# Altium PCB CANable-250818.PcbDoc
Units mm, origin at the board's own origin, x right, y up, seen from the top; angles counter-clockwise.
Board outline 50 x 33.5 mm, 2 copper layers (Top Layer, Bottom Layer); 38 components, 24 nets, 154 pads, 192 vias.
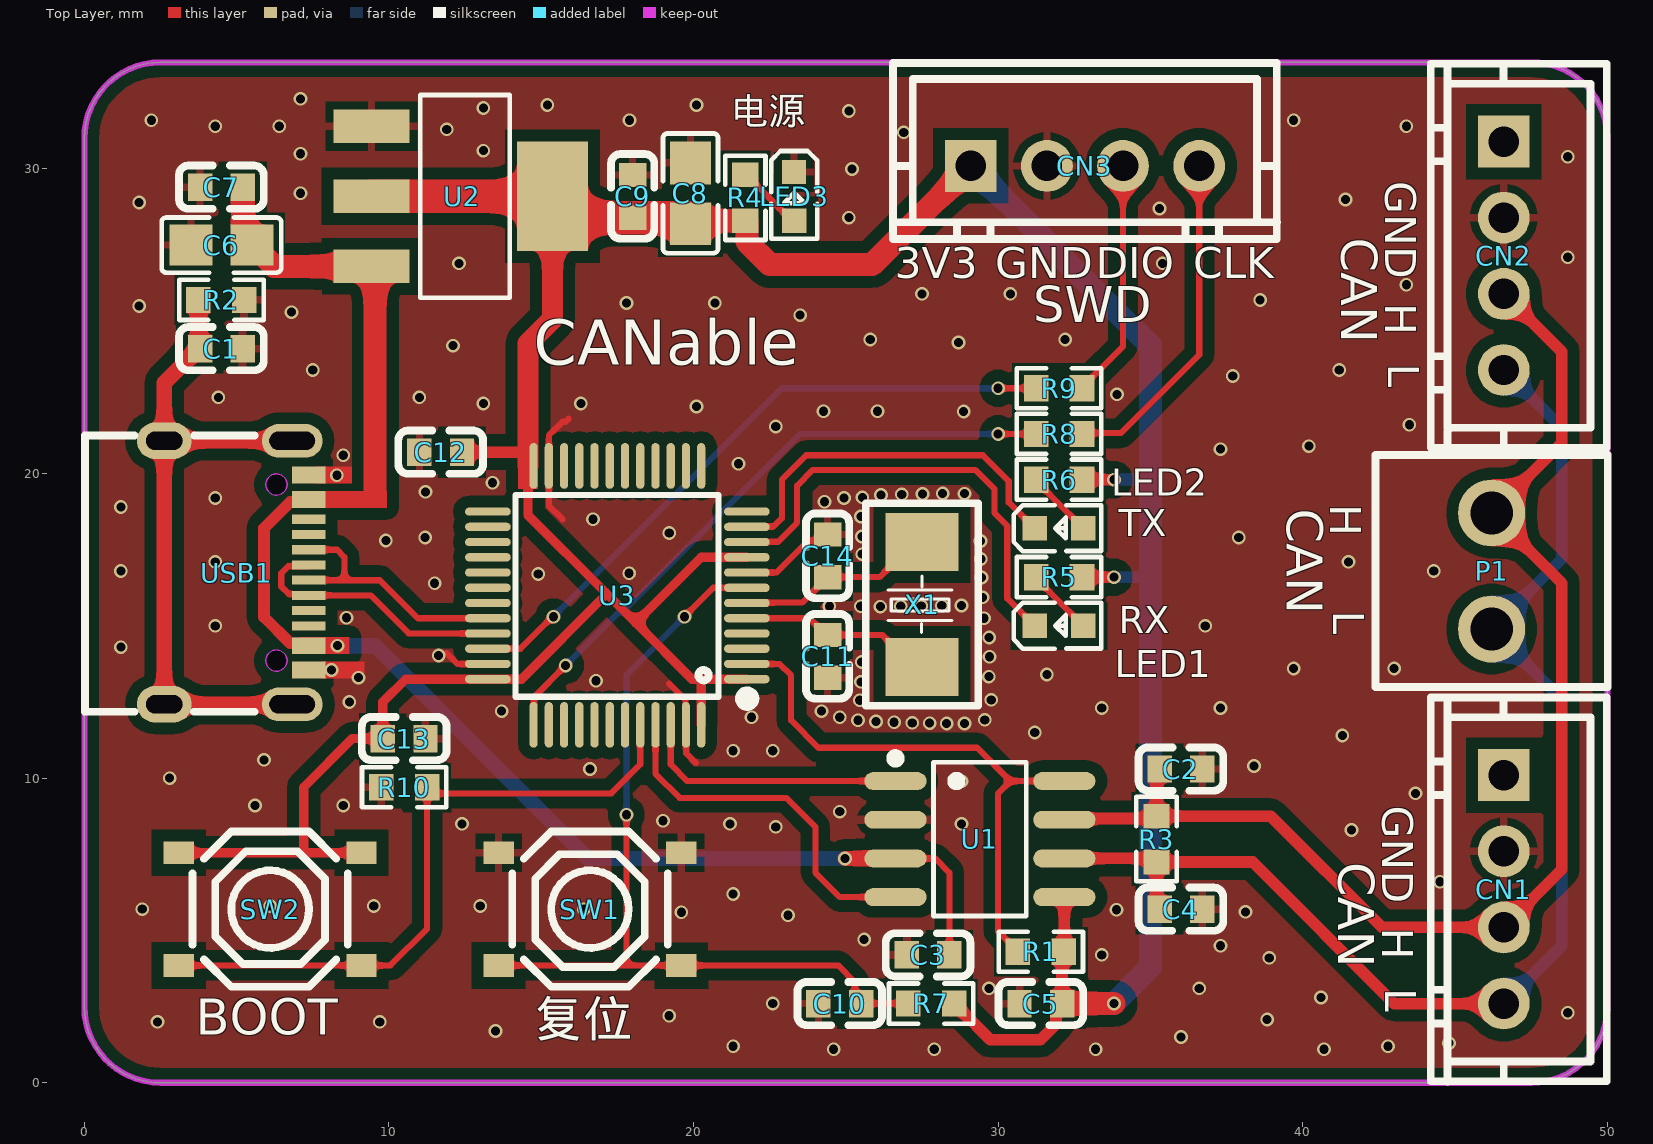
[diagram p0: Top Layer view]
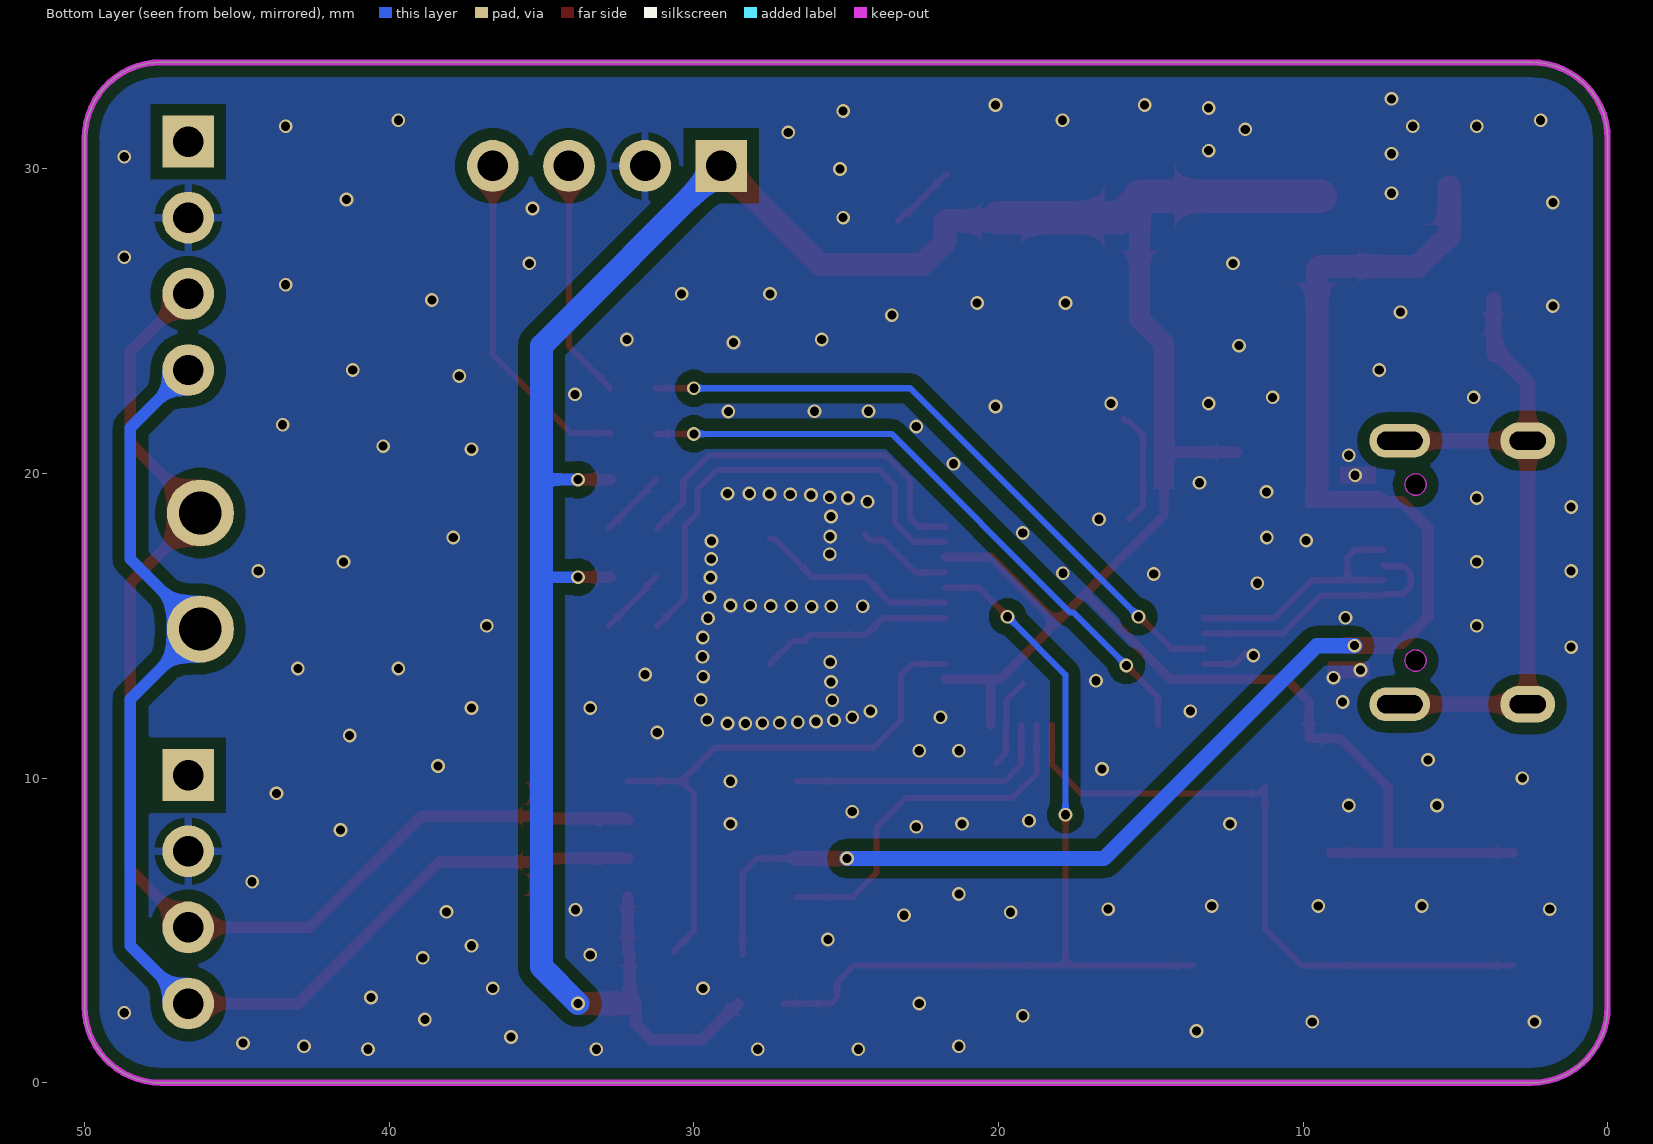
[diagram p1: Bottom Layer view, seen from below]

## Layer stack, top to bottom
Top Solder: solder mask 0.0102, Solder Resist, Dk 3.5
Top Layer: signal copper 0.0356
Dielectric 1: dielectric 0.32, FR-4, Dk 4.8
Bottom Layer: signal copper 0.0356
Bottom Solder: solder mask 0.0102, Solder Resist, Dk 3.5

## Board outline
0,2.5 0,31 cw(c2.5,31) 2.5,33.5 47.5,33.5 cw(c47.5,31) 50,31 50,2.5 cw(c47.5,2.5) 47.5,0 2.5,0 cw(c2.5,2.5)

## Design rules (kind name [scope] priority, off if disabled: settings)
Clearance Clearance_1 [InPolygon] p1: gap=0.381 ignorepadtopadclearanceinfootprint=FALSE
Clearance [All] p2: gap=0.152 ignorepadtopadclearanceinfootprint=FALSE
ComponentClearance [All] p1 off: gap=0.254 collisioncheckmode=3 verticalgap=0.254 showdistances=FALSE
HoleToHoleClearance [All] p1 off: gap=0.254 allowstackedmicrovias=TRUE
MinimumSolderMaskSliver [All] p1 off: minsoldermaskwidth=0.254
PolygonConnect PolygonConnect_1 [IsVia] p1: connectstyle=Direct reliefconductorwidth=0.254 reliefentries=4 polygonreliefangle="90 Angle" airgapwidth=0.254
PolygonConnect [All] p2: connectstyle=Relief reliefconductorwidth=0.254 reliefentries=4 polygonreliefangle="90 Angle" airgapwidth=0.254
RoutingVias [All] p1: holewidth=0.3 width=0.45 viastyle="Through Hole" minholewidth=0.3 minwidth=0.4 maxholewidth=5 maxwidth=5
SilkToSilkClearance [All] p1 off: silktosilkclearance=0.254
SilkToSolderMaskClearance [IsPad] p1 off: minsilkscreentomaskgap=0.254 clearancetoexposedcopper=TRUE
SolderMaskExpansion [All] p1: expansion=0.102 istentingtop=FALSE
Width [All] p1: maxlimit=2.54 minlimit=0.152 preferedwidth=0.203
25 further rules are at their usual default settings.

## Components (designator, comment, footprint, x,y, rotation, side; value= is the part's Value field where it differs from the comment)
C1 "100nF" C0603 4.5,24.1 r0 top
C2 "20pF" C0603 36,10.3 r0 top
C3 "100nF" C0603 27.7,4.2 r0 top
C4 "20pF" C0603 36,5.7 r180 top
C5 "100nF" C0603 31.4,2.6 r180 top
C6 "10uF" C0805 4.5,27.5 r180 top
C7 "100nF" C0603 4.5,29.4 r180 top
C8 "10uF" C0805 19.9,29.2 r90 top
C9 "100nF" C0603 18,29.1 r90 top
C10 "100nF" C0603 24.8,2.6 r180 top
C11 "20pF" C0603 24.4,14 r90 top locked
C12 "100nF" C0603 11.7,20.7 r180 top
C13 "100nF" C0603 10.5,11.3 r0 top
C14 "20pF" C0603 24.4,17.3 r270 top locked
CN1 "XH-4A" CONN-TH_4P-P2.50_XH-4A 46.6,6.35 r270 top locked
CN2 "XH-4A" CONN-TH_4P-P2.50_XH-4A 46.6,27.15 r270 top locked
CN3 "XH-4A" CONN-TH_4P-P2.50_XH-4A 32.85,30.1 r0 top locked
LED1 "KT-0603R" LED0603-RD 32,15 r0 top
LED2 "KT-0603R" LED0603-RD 32,18.2 r0 top
LED3 "KT-0603R" LED0603-RD 23.3,29.1 r270 top
P1 "WJ124-3.81-2P" CONN-TH_2P-P3.81_KF124-3.81-2P 46.2,16.8 r90 top locked
R1 "10kΩ" R0603 31.4,4.3 r0 top
R2 "1MΩ" R0603 4.5,25.7 r0 top
R3 "120Ω" R0603 35.2,8 r270 top
R4 "1kΩ" R0603 21.7,29.053 r90 top
R5 "1kΩ" R0603 32,16.6 r180 top
R6 "1kΩ" R0603 32,19.8 r180 top
R7 "10kΩ" R0603 27.8,2.6 r180 top
R8 "100Ω" R0603 32,21.3 r0 top
R9 "100Ω" R0603 32,22.8 r0 top
R10 "10kΩ" R0603 10.5,9.7 r180 top
SW1 "TS-1187A-B-A-B" SW-SMD_4P-L5.1-W5.1-P3.70-LS6.5-TL_H1.5 16.6,5.7 r0 top
SW2 "TS-1187A-B-A-B" SW-SMD_4P-L5.1-W5.1-P3.70-LS6.5-TL_H1.5 6.1,5.7 r180 top
U1 "TJA1051T/3/1J" SOIC-8_L4.9-W3.9-P1.27-LS6.0-BL 29.4,8 r270 top
U2 "AMS1117-3.3" SOT-223-3_L6.5-W3.4-P2.30-LS7.0-BR 12.4,29.1 r180 top
U3 "STM32F072CBT6" LQFP-48_L7.0-W7.0-P0.50-LS9.0-BL 17.5,16 r90 top locked
USB1 "TYPE-C 16PIN 2MD(073)" USB-C-SMD_TYPE-C-6PIN-2MD-073 5,16.75 r270 top locked
X1 "8MHz" CRYSTAL-SMD_L5.0-W3.2 27.5,15.7 r270 top locked

## Footprints (in the part's own frame and the unit in brackets; to place one, negate y for a bottom-side part, rotate by r counter-clockwise, add the part's x,y. Pads: shape width x height; smd on the part's side, far side on the other; paste and mask are expansions set on the pad)
C0603 [mm]
  rect 0.8x0.9 smd: 1(-0.7,0) 2(0.7,0)
  silkscreen extent -1.39,-0.71 1.39,0.71
C0805 [mm]
  rect 1.41x1.35 smd paste-100 mask+0.051: 1(-1,0) 2(1,0)
  silkscreen extent -1.96,-0.9 1.96,0.9
CONN-TH_2P-P3.81_KF124-3.81-2P [mm]
  round 2.2 hole 1.4: 1(-1.905,0) 2(1.905,0)
  silkscreen extent -3.81,-3.81 3.81,3.81
CONN-TH_4P-P2.50_XH-4A [mm]
  rect 1.7x1.7 hole 1: 1(-3.75,0)
  round 1.7 hole 1: 2(-1.25,0) 3(1.25,0) 4(3.75,0)
  silkscreen extent -6.3,-2.4 6.31,3.38
CRYSTAL-SMD_L5.0-W3.2 [mm]
  rect 1.9x2.4 smd: 1(-2.05,0) 2(2.05,0)
  silkscreen extent -3.32,-1.85 3.33,1.85
LED0603-RD [mm]
  rect 0.8x0.8 smd: 1(-0.799,0) 2(0.799,0)
  silkscreen extent -1.49,-0.75 1.39,0.76
LQFP-48_L7.0-W7.0-P0.50-LS9.0-BL [mm]
  oval 0.27x1.5 smd paste+0 mask+0.05: 1(-2.75,-4.25) 2(-2.25,-4.25) 3(-1.75,-4.25) 4(-1.25,-4.25) 5(-0.75,-4.25) 6(-0.25,-4.25) 7(0.25,-4.25) 8(0.75,-4.25) 9(1.25,-4.25) 10(1.75,-4.25) 11(2.25,-4.25) 12(2.75,-4.25) 25(2.75,4.25) 26(2.25,4.25) 27(1.75,4.25) 28(1.25,4.25) 29(0.75,4.25) 30(0.25,4.25) 31(-0.25,4.25) 32(-0.75,4.25) 33(-1.25,4.25) 34(-1.75,4.25) 35(-2.25,4.25) 36(-2.75,4.25)
  oval 1.5x0.27 smd paste+0 mask+0.05: 13(4.25,-2.75) 14(4.25,-2.25) 15(4.25,-1.75) 16(4.25,-1.25) 17(4.25,-0.75) 18(4.25,-0.25) 19(4.25,0.25) 20(4.25,0.75) 21(4.25,1.25) 22(4.25,1.75) 23(4.25,2.25) 24(4.25,2.75) 37(-4.25,2.75) 38(-4.25,2.25) 39(-4.25,1.75) 40(-4.25,1.25) 41(-4.25,0.75) 42(-4.25,0.25) 43(-4.25,-0.25) 44(-4.25,-0.75) 45(-4.25,-1.25) 46(-4.25,-1.75) 47(-4.25,-2.25) 48(-4.25,-2.75)
  silkscreen extent -3.59,-4.46 3.3,3.34
R0603 [mm]
  rect 0.806x0.864 smd paste-100 mask+0.051: 1(-0.753,0) 2(0.753,0)
  silkscreen extent -1.39,-0.66 1.39,0.66
SOIC-8_L4.9-W3.9-P1.27-LS6.0-BL [mm]
  oval 0.588x2.045 smd: 1(-1.905,-2.772) 2(-0.635,-2.772) 3(0.635,-2.772) 4(1.905,-2.772) 5(1.905,2.772) 6(0.635,2.772) 7(-0.635,2.772) 8(-1.905,2.772)
  silkscreen extent -2.8,-2.92 2.53,1.52
SOT-223-3_L6.5-W3.4-P2.30-LS7.0-BR [mm]
  rect 2.5x1.1 smd: 1(2.97,-2.3) 2(2.97,0) 3(2.97,2.3)
  rect 2.34x3.6 smd: 4(-2.97,0)
  silkscreen extent -1.57,-3.33 1.37,3.33
SW-SMD_4P-L5.1-W5.1-P3.70-LS6.5-TL_H1.5 [mm]
  rect 1x0.75 smd: 1(-3,1.85) 2(3,1.85) 3(-3,-1.85) 4(3,-1.85)
  silkscreen extent -2.55,-2.55 2.55,2.55
USB-C-SMD_TYPE-C-6PIN-2MD-073 [mm]
  rect 0.55x1.1 smd paste-100 mask+0.05: 1(-3.2,2.375) 2(-2.4,2.375) 11(2.4,2.375) 12(3.2,2.375)
  rect 0.3x1.1 smd paste-100 mask+0.05: 3(-1.75,2.375) 4(-1.25,2.375) 5(-0.75,2.375) 6(-0.25,2.375) 7(0.25,2.375) 8(0.75,2.375) 9(1.25,2.375) 10(1.75,2.375)
  oval 1.2x1.8 hole 0.6 slot 1.2 at 90 deg paste+0 mask+0.05: 13(-4.325,-2.375) 14(4.325,-2.375)
  oval 1.1x2 hole 0.6 slot 1.5 at 90 deg paste+0 mask+0.05: 13(-4.325,1.825) 14(4.325,1.825)
  Keep-Out Layer board cut-out: 3.24,1.305 3.205,1.153 3.108,1.031 2.968,0.964 2.812,0.964 2.672,1.031 2.575,1.153 2.54,1.305 2.54,1.305 2.575,1.457 2.672,1.579 2.812,1.646 2.968,1.646 3.108,1.579 3.205,1.457 3.24,1.305
  Keep-Out Layer board cut-out: -2.54,1.305 -2.575,1.153 -2.672,1.031 -2.812,0.964 -2.968,0.964 -3.108,1.031 -3.205,1.153 -3.24,1.305 -3.24,1.305 -3.205,1.457 -3.108,1.579 -2.968,1.646 -2.812,1.646 -2.672,1.579 -2.575,1.457 -2.54,1.305
  Keep-Out Layer circle w0.025: c2.89,1.305 r0.35
  Keep-Out Layer circle w0.025: c-2.89,1.305 r0.35
  Keep-Out Layer region: 3.24,1.305 3.205,1.153 3.108,1.031 2.968,0.964 2.812,0.964 2.672,1.031 2.575,1.153 2.54,1.305 2.54,1.305 2.575,1.457 2.672,1.579 2.812,1.646 2.968,1.646 3.108,1.579 3.205,1.457 3.24,1.305
  Keep-Out Layer region: -2.54,1.305 -2.575,1.153 -2.672,1.031 -2.812,0.964 -2.968,0.964 -3.108,1.031 -3.205,1.153 -3.24,1.305 -3.24,1.305 -3.205,1.457 -3.108,1.579 -2.968,1.646 -2.812,1.646 -2.672,1.579 -2.575,1.457 -2.54,1.305
  silkscreen extent -4.5,-4.97 4.57,0.6

## Part data
C1 C3 C5 C7 C9 C10 C12 C13: library part CC0603KRX7R9BB104, JLCPCB Part Class="Basic Part", LCSC Part Name="100nF ±10% 50V", Manufacturer=YAGEO(国巨), Temperature Coefficient=X7R, Tolerance=±10%, Voltage Rating=50V, Add into BOM=yes, Convert to PCB=yes, Datasheet=https://atta.szlcsc.com/upload/public/pdf/source/20250214/096C4C206003071F5D32E5F0D8E7F8DF.pdf, Device=CC0603KRX7R9BB104, Manufacturer Part=CC0603KRX7R9BB104, Supplier=LCSC, Supplier Footprint=0603, Supplier Part=C14663, Symbol=CC0603KRX7R9BB104
C2 C4 C11 C14: library part CL10C200JB8NNNC, JLCPCB Part Class="Basic Part", LCSC Part Name="20pF ±5% 50V", Manufacturer=SAMSUNG(三星), Temperature Coefficient=C0G, Tolerance=±5%, Voltage Rating=50V, Add into BOM=yes, Convert to PCB=yes, Datasheet=https://item.szlcsc.com/datasheet/CL10C200JB8NNNC/2000.html, Device=CL10C200JB8NNNC, Manufacturer Part=CL10C200JB8NNNC, Supplier=LCSC, Supplier Footprint=0603, Supplier Part=C1648, Symbol=CL10C200JB8NNNC
C6 C8: library part CL21A106KAYNNNE_C15850, JLCPCB Part Class="Basic Part", LCSC Part Name="10uF ±10% 25V", Manufacturer=SAMSUNG(三星), Manufacturer Part=CL21A106KAYNNNE, Temperature Coefficient=X5R, Tolerance=±10%, Voltage Rated=25V, Add into BOM=yes, Convert to PCB=yes, Datasheet=https://atta.szlcsc.com/upload/public/pdf/source/20160218/1457707763339.pdf, Device=CL21A106KAYNNNE_C15850, Supplier=LCSC, Supplier Footprint=0805, Supplier Part=C15850, Symbol=CL21A106KAYNNNE
CN1 CN2 CN3: library part XH-4A_C37815, Color=-, JLCPCB Part Class="Extended Part", LCSC Part Name="1x4P 间距:2.5mm 直插 系列:XH", Manufacturer=BOOMELE(博穆精密), Add into BOM=yes, Contact Material=-, Contact Plating=-, Convert to PCB=yes, Current Rating=-, Datasheet=https://atta.szlcsc.com/upload/public/pdf/source/20181205/C146112_2CB31444E6250AC61E2A41A9A8391D5F.pdf, Device=XH-4A_C37815, Flame Retardant Rating=-, Manufacturer Part=XH-4A, Mounting Type=直插, Number of Pins=4P, Number of PINs Per Row=4, Number of Rows=1, Operating Temperature=-, Pins Structure=1x4P, Pitch=2.5mm, Plastic Material=-, Reference Series=XH, Row Spacing=-, Supplementary Features=-, Supplier=LCSC, Supplier Footprint=插件,P=2.5mm, Supplier Part=C37815, Symbol=XH-4A, Voltage Rating=-, X-Length of Bottom Edge on Board (Spacing Line)=-, Y-Width of Bottom Edge on Board=-, Z-Height of the Board=-
LED1 LED2 LED3: Color Temperature=-, Emitted Color=红色, JLCPCB Part Class="Basic Part", LCSC Part Name="0603 红灯 高亮", Manufacturer=KENTO, Operating Temperature=-40℃~+85℃, Add into BOM=yes, Convert to PCB=yes, Datasheet=https://atta.szlcsc.com/upload/public/pdf/source/20160616/1466072038404.pdf, Device=KT-0603R, Diode Configuration=-, Dominant Wavelength=-, Forward Current=-, Lens Color=-, Manufacturer Part=KT-0603R, Mounting Sytle=-, Peak Wavelength=-, Power Dissipation=-, Supplier=LCSC, Supplier Footprint=0603, Supplier Part=C2286, Symbol=KT-0603R, Viewing Angle=-
P1: Color=绿色, Current Rating (Max)=15A, JLCPCB Part Class="Extended Part", LCSC Part Name="3.81mm 1x2P 排数:1 每排P数:2 直插", Manufacturer=KANGNEX(康奈克斯电气), Operating Temperature Range=-40℃~+105℃, Voltage Rating (Max)=300V, Add into BOM=yes, Convert to PCB=yes, Datasheet=https://atta.szlcsc.com/upload/public/pdf/source/20191225/C69811_9330EF2523583BB8A7E3F75AE744BFE0.pdf, Device=WJ124-3.81-2P, Manufacturer Part=WJ124-3.81-2P, Mounting Style=直插, Number of Pins=2P, Number of PINs Per Row=2, Number of Rows=1, Pitch=3.81mm, Structure=1x2P, Supplier=LCSC, Supplier Footprint=插件,P=3.81mm, Supplier Part=C69811, Symbol=WJ124-3.81-2P, Wire Gauge - AWG=14~30, Wire Gauge - mm2=1.5
R1 R7 R10: library part 0603WAF1002T5E, JLCPCB Part Class="Basic Part", LCSC Part Name="厚膜电阻 10kΩ ±1% 100mW", Manufacturer=UNI-ROYAL(厚声), Operating Temperature=-55℃~+155℃, Power(Watts)=100mW, Temperature Coefficient=±100ppm/℃, Tolerance=±1%, Voltage-Supply(Max)=75V, Add into BOM=yes, Convert to PCB=yes, Datasheet=https://atta.szlcsc.com/upload/public/pdf/source/20200306/C422600_1E6D84923E4A46A82E41ADD87F860B5C.pdf, Device=0603WAF1002T5E, Manufacturer Part=0603WAF1002T5E, Supplier=LCSC, Supplier Footprint=0603, Supplier Part=C25804, Symbol=0603WAF1002T5E, Type=厚膜电阻
R2: library part 0603WAF1004T5E, JLCPCB Part Class="Basic Part", LCSC Part Name="1MΩ ±1% 100mW 厚膜电阻", Manufacturer=UNI-ROYAL(厚声), Operating Temperature Range=-55℃~+155℃, Overload Voltage (Max)=75V, Power(Watts)=100mW, Temperature Coefficient=±100ppm/℃, Tolerance=±1%, Add into BOM=yes, Convert to PCB=yes, Datasheet=https://atta.szlcsc.com/upload/public/pdf/source/20200306/C422600_1E6D84923E4A46A82E41ADD87F860B5C.pdf, Device=0603WAF1004T5E, Manufacturer Part=0603WAF1004T5E, Supplier=LCSC, Supplier Footprint=0603, Supplier Part=C22935, Symbol=0603WAF1004T5E, Type=厚膜电阻
R3: library part 0603WAF1200T5E, JLCPCB Part Class="Basic Part", LCSC Part Name="120Ω ±1% 100mW 厚膜电阻", Manufacturer=UNI-ROYAL(厚声), Operating Temperature Range=-55℃~+155℃, Overload Voltage (Max)=75V, Power(Watts)=100mW, Temperature Coefficient=±100ppm/℃, Tolerance=±1%, Add into BOM=yes, Convert to PCB=yes, Datasheet=https://atta.szlcsc.com/upload/public/pdf/source/20200306/C422600_1E6D84923E4A46A82E41ADD87F860B5C.pdf, Device=0603WAF1200T5E, Manufacturer Part=0603WAF1200T5E, Supplier=LCSC, Supplier Footprint=0603, Supplier Part=C22787, Symbol=0603WAF1200T5E, Type=厚膜电阻
R4 R5 R6: library part 0603WAF1001T5E, JLCPCB Part Class="Basic Part", LCSC Part Name="1kΩ ±1% 100mW 厚膜电阻", Manufacturer=UNI-ROYAL(厚声), Operating Temperature Range=-55℃~+155℃, Overload Voltage (Max)=75V, Power(Watts)=100mW, Temperature Coefficient=±100ppm/℃, Tolerance=±1%, Add into BOM=yes, Convert to PCB=yes, Datasheet=https://atta.szlcsc.com/upload/public/pdf/source/20200306/C422600_1E6D84923E4A46A82E41ADD87F860B5C.pdf, Device=0603WAF1001T5E, Manufacturer Part=0603WAF1001T5E, Supplier=LCSC, Supplier Footprint=0603, Supplier Part=C21190, Symbol=0603WAF1001T5E, Type=厚膜电阻
R8 R9: library part 0603WAF1000T5E, JLCPCB Part Class="Basic Part", LCSC Part Name="100Ω ±1% 100mW 厚膜电阻", Manufacturer=UNI-ROYAL(厚声), Operating Temperature Range=-55℃~+155℃, Overload Voltage (Max)=75V, Power(Watts)=100mW, Temperature Coefficient=±200ppm/℃, Tolerance=±1%, Add into BOM=yes, Convert to PCB=yes, Datasheet=https://atta.szlcsc.com/upload/public/pdf/source/20200306/C422600_1E6D84923E4A46A82E41ADD87F860B5C.pdf, Device=0603WAF1000T5E, Manufacturer Part=0603WAF1000T5E, Supplier=LCSC, Supplier Footprint=0603, Supplier Part=C22775, Symbol=0603WAF1000T5E, Type=厚膜电阻
SW1 SW2: Actuator/Cap Color=金色, Contact Current=50mA, Insulation Resistance=-, JLCPCB Part Class="Basic Part", LCSC Part Name="5.1*5.1*1.5mm 立贴 轻触开关", Manufacturer="XKB Connectivity(中国星坤)", Operating Force=160gf, Operating Temperature=-30℃~+85℃, Voltage Rating (DC)=12V, Actuator Style=圆形按钮, Add into BOM=yes, Circuit=单刀单掷, Convert to PCB=yes, Datasheet=https://atta.szlcsc.com/upload/public/pdf/source/20200227/C318890_053E50208A88A7BA1965D8746000774E.pdf, Device=TS-1187A-B-A-B, Manufacturer Part=TS-1187A-B-A-B, Mechanical Life=10万次, Mounting Style=立贴, Strike Gundam=不带, Supplier=LCSC, Supplier Footprint=SMD, Supplier Part=C318884, Switch Height=1.5mm, Switch Length=5.1mm, Switch Width=5.1mm, Symbol=TS-1187A-B-A-B, With Lamp=无
U1: JLCPCB Part Class="Extended Part", Manufacturer=NXP(恩智浦), Operating Temperature=-40℃~+150℃, Supply Current=5mA, Supply Voltage=4.5V~5.5V, Add into BOM=yes, Convert to PCB=yes, Data Rate=5Mbps, Datasheet=https://www.nxp.com/docs/en/data-sheet/TJA1051.pdf, Device=TJA1051T/3/1J, LCSC Part Name=TJA1051T/3/1J, Manufacturer Part=TJA1051T/3/1J, Supplier=LCSC, Supplier Footprint=SOIC-8-150mil, Supplier Part=C38695, Symbol=TJA1051T/3/1J, Type=-
U2: library part AMS1117-3.3_C6186, JLCPCB Part Class="Basic Part", LCSC Part Name="输出3.3V 1A", Manufacturer=AMS, Operating Temperature=-40℃~+125℃, Output Current=1A, Output Voltage=3.3V, Power Supply Rejection Ratio (PSRR)=72dB@(120Hz), standby current=5mA, Voltage - Supply=16V, Voltage Dropout=1.1V@(800mA), Add into BOM=yes, Convert to PCB=yes, Datasheet=https://item.szlcsc.com/datasheet/AMS1117-3.3/6652.html, Device=AMS1117-3.3_C6186, Features=过流保护；过热保护, Manufacturer Part=AMS1117-3.3, Noise=-, Number of Outputs=1, Output Configuration=正极, Output Type=固定, Supplier=LCSC, Supplier Footprint=SOT-223, Supplier Part=C6186, Symbol=AMS1117-3.3
U3: JLCPCB Part Class="Extended Part", LCSC Part Name="主流ARM Cortex-M0 USB系列MCU，具有128 KB Flash、48 MHz CPU、USB、CAN和CEC功能", Manufacturer=ST(意法半导体), Voltage - Supply=1.65V~3.6V, ADC (Bit)=12bit, Add into BOM=yes, Applications=-, Convert to PCB=yes, CPU Core=ARM-M0, CPU Maximum Speed=48MHz, DAC (Bit)=12bit, Datasheet=https://atta.szlcsc.com/upload/public/pdf/source/20171102/C125825_15096092762561078351.pdf, Device=STM32F072CBT6, Manufacturer Part=STM32F072CBT6, Number of I/O=37, Program Memory Type=FLASH, Program Storage Size=128KB, Supplier=LCSC, Supplier Footprint=LQFP-48(7x7), Supplier Part=C81720, Symbol=STM32F072CBT6
USB1: Current Rating-Power=3A, Detection color=黑色, JLCPCB Part Class="Extended Part", LCSC Part Name="Type-C 母 卧贴", Manufacturer="SHOU HAN(首韩)", Operating Temperature=-25℃~+85℃, Voltage Rating=5V, Add into BOM=yes, Center Height=-, Connect-Disconnect Life=5千次, Connector Type=Type-C, Convert to PCB=yes, Datasheet=https://item.szlcsc.com/datasheet/TYPE-C%252016PIN%25202MD(073)/2901843.html, Device="TYPE-C 16PIN 2MD(073)", Gender=母, Length=-, Manufacturer Part="TYPE-C 16PIN 2MD(073)", Mounting Type=卧贴, Number of Contacts=16P, Number of Ports=1, Protocol Standard="USB 3.1", Supplementary Features=-, Supplier=LCSC, Supplier Footprint=SMD, Supplier Part=C2765186, Symbol="TYPE-C 16PIN 2MD(073)"
X1: library part X50328MSB2GI, Frequency Stability=±20ppm, JLCPCB Part Class="Basic Part", LCSC Part Name="YSX530GA 8MHZ 2P 5032 20PF ±10PPM -40~85℃ (±20PPM)", Load Capacitance=20pF, Manufacturer=YXC(扬兴晶振), Normal temperature Frequency Tolerance=±10ppm, Operating Temperature=-40℃~+85℃, Add into BOM=yes, Convert to PCB=yes, Datasheet=https://item.szlcsc.com/datasheet/X50328MSB2GI/117214.html, Device=X50328MSB2GI, Manufacturer Part=X50328MSB2GI, Supplier=LCSC, Supplier Footprint=SMD5032-2P, Supplier Part=C115962, Symbol=X50328MSB2GI, Type=贴片晶振

## Via types
v1: diameter 0.45, hole 0.3, Top Layer to Bottom Layer, 192 vias

## Nets (pads, with @x,y where several pads share a name; then routed paths per layer and width w, separated by ;. In a path a pad name is that pad's centre, name@x,y a point inside that pad or via, vN(x,y) a via of type N, cw(c..) or ccw(c..) an arc to the next point about the centre after c; other vN are vias at no path point)
3V3: C5.1 C8.1 C9.1 C12.1 C13.1 CN3.1 R1.2 R4.1 R5.1 R6.1 R7.1 SW2.3 SW2.4 U1.5 U2.2 U2.4 U3.1 U3.9 U3.24 U3.36 U3.48 | length 117.4
  Top Layer w0.254: R1.2@32.1,4.247 R1.2 R1.2@32.172,4.319
  Top Layer w0.305: SW2.4 SW2.3 ; 7.2,7.6 7.2,9.7 8.8,11.3 C13.1 9.8,12.5 10.55,13.25 U3.36 14.35,13.25 17.1,16 17.1,16.1 ; 14.567,20.25 14.567,18.633 17.1,16.1 ; U3.48 20.25,13.2 20.2,13.25 ; U3.1 20.2,13.25 ; U3.9 20.25,17.25 18.1,15.1 ; 17.1,16.1 18.1,15.1 ; 18.1,15.1 19.95,13.25 20.2,13.25
  Top Layer w0.381: C12.1@12.2,20.7 14.467,20.7 14.567,20.8 ; R7.1 28.553,2.571 28.766,2.358 28.795,2.358 29.74,1.414 31.39,1.414 31.891,1.915 31.891,2.391 C5.1 R1.2@32.1,4.247 ; R1.2@32.172,4.319 U1.5 ; R5.1 v1(33.8,16.6) ; R6.1 v1(33.8,19.8)
  Top Layer w0.686: 14.567,20.25 14.567,20.8 14.567,24.273 15.37,25.077 15.37,29.024 U2.4
  Top Layer w0.762: C8.1@20,28.3 R4.1 21.729,28.3 21.751,28.278 21.751,27.613 22.502,26.862 25.862,26.862 CN3.1 ; C5.1 v1(33.8,2.6)
  Top Layer w1.092: U2.2 U2.4 ; U2.4@15.37,29.024 15.994,28.4 C9.1 C8.1@20,28.4
  Bottom Layer w0.381: v1(33.8,16.6) 34.9,16.6 35,16.7 ; v1(33.8,19.8) 35,19.8
  Bottom Layer w0.762: CN3.1 35,24.2 35,19.8 35,16.7 35,3.8 v1(33.8,2.6)
5V: C3.2 C6.1 C7.1 U1.3 U2.3 USB1.2 USB1.11 | length 46.2
  Top Layer w0.203: U1.3 27.935,7.365 28.4,6.9 C3.2
  Top Layer w0.381: USB1.11 7.291,14.434 6.756,14.434 5.9,15.29 5.9,18.21 6.756,19.065 7.291,19.065 USB1.2
  Top Layer w0.508: v1(24.975,7.363) 26.625,7.363 U1.3
  Top Layer w0.762: C7.1 5.2,27.794 5.494,27.5 C6.1 5.53,27.5 6.23,26.8 U2.3 9.547,26.683 9.547,19.394
  Bottom Layer w0.508: v1(8.31,14.352) 9.548,14.352 16.537,7.363 v1(24.975,7.363)
BOOT0: R10.1 SW2.1 SW2.2 U3.44 | length 22.1
  Top Layer w0.203: SW2.2 SW2.1 10.05,3.85 11.253,5.053 R10.1 11.453,9.5 17.3,9.5 18.25,10.45 U3.44
CAN_S: R1.1 U1.8 U3.2 | length 18.9
  Top Layer w0.203: U3.2 22.821,13.75 23.2,13.371 23.2,11.9 24.1,11 29.31,11 30.405,9.905 ; R1.1 30.647,4.329 30,4.975 30,9.5 30.405,9.905 ; U1.8 30.405,9.905
CANRX: U1.4 U3.45 | length 12
  Top Layer w0.203: U3.45 18.75,10.15 19.55,9.35 23.05,9.35 24,8.4 24,6.9 24.805,6.095 U1.4
CANTX: U1.1 U3.46 | length 8.9
  Top Layer w0.203: U3.46 19.25,10.45 19.795,9.905 U1.1
DN: U3.32 USB1.5 USB1.7 | length 8.4
  Top Layer w0.203: USB1.7 8.538,16.5 ; USB1.5 8.297,17.5 8.538,17.26 8.538,16.5 ; U3.32 10.95,15.25 9.7,16.5 8.538,16.5
DP: U3.33 USB1.6 USB1.8 | length 8.9
  Top Layer w0.203: USB1.6 7.332,16.957 6.693,16.957 6.464,16.728 6.464,16.292 6.707,16.048 7.327,16.048 USB1.8 9.4,16 10.65,14.75 U3.33
EGND: C1.1 R2.1 USB1.13 USB1.14 | length 22.1
  Top Layer w0.508: USB1.13@2.738,21.075 USB1.13@6.825,21.075 ; R2.1 3.747,23.997 3.654,23.904 3.551,23.904 2.625,22.978 2.625,21.075 2.625,12.425 USB1.14@6.825,12.425
GND: C1.2 C2.2 C3.1 C4.1 C5.2 C6.2 C7.2 C8.2 C9.2 C10.2 C11.1 C12.2 C13.2 C14.1 CN1.2 CN2.2 CN3.2 LED3.1 R2.2 R10.2 SW1.1 SW1.2 U1.2 U2.1 U3.8 U3.23 U3.35 U3.47 USB1.1 USB1.12 | length 11.4
  Top Layer w0.203: 11.9,14.1 12.25,13.75 U3.35 ; 15.7,18.5 15.25,18.95 U3.23 15.25,21.25 15.7,21.7 15.8,21.7 15.9,21.8 ; 19.2,13.1 19.737,12.563 19.737,11.763 U3.47 19.763,11.737 19.763,10.815 20.076,10.502 ; U3.8 22.714,16.75 23.764,17.8 24.2,17.8 C14.1
  other v1: 24.6,1.1 27.9,1.1 33.2,1.1 40.7,1.1 21.3,1.2 42.8,1.2 44.8,1.3 36,1.5 13.5,1.7 2.4,2 9.7,2 38.83,2.075 19.2,2.2 48.7,2.3 22.6,2.6 40.6,2.8 29.7,3.1 36.6,3.1 38.9,4.1 33.4,4.2 37.3,4.5 25.6,4.7 23.1,5.5 19.6,5.6 38.119,5.61 1.9,5.7 16.4,5.7 33.887,5.681 6.1,5.8 9.5,5.8 13,5.8 21.3,6.2 44.5,6.6 41.6,8.3 22.7,8.4 12.4,8.5 21.2,8.5 28.8,8.5 19,8.6 24.8,8.9 5.6,9.1 8.5,9.1 43.7,9.5 28.8,9.9 2.8,10 16.6,10.3 38.4,10.4 5.9,10.6 21.3,10.9 22.6,10.9 41.3,11.4 31.2,11.5 28.31,11.796 28.898,11.794 27.182,11.816 27.75,11.805 26.585,11.833 25.987,11.859 25.4,11.9 29.558,11.914 21.9,12 24.8,12 13.7,12.2 24.2,12.2 33.4,12.3 37.3,12.3 8.7,12.5 25.457,12.559 29.773,12.57 25.5,13.162 16.8,13.2 9,13.3 29.695,13.332 31.6,13.4 8.113,13.553 39.7,13.6 43,13.6 25.524,13.812 29.716,13.985 11.632,14.026 1.2,14.3 29.704,14.618 4.3,15 36.8,15 29.532,15.25 8.606,15.267 26.132,15.63 24.459,15.641 25.491,15.641 26.802,15.642 27.476,15.649 28.146,15.665 28.797,15.668 29.483,15.936 11.5,16.4 29.452,16.586 14.9,16.7 17.885,16.726 1.2,16.8 44.3,16.8 4.3,17.1 41.5,17.1 29.427,17.195 25.538,17.353 29.42,17.786 9.9,17.8 11.188,17.898 37.9,17.9 25.526,17.935 19.203,18.051 16.7,18.5 25.499,18.591 1.2,18.9 24.301,19.074 4.3,19.2 24.937,19.196 25.542,19.218 26.155,19.294 26.836,19.317 27.513,19.328 28.893,19.34 28.179,19.343 11.2,19.4 13.4,19.7 8.289,19.943 21.474,20.322 8.5,20.6 37.3,20.8 40.2,20.9 22.7,21.542 43.5,21.6 24.269,22.047 26.041,22.047 28.867,22.037 20.1,22.2 13.1,22.3 16.3,22.3 4.4,22.5 11,22.5 33.9,22.6 37.7,23.2 7.5,23.4 41.2,23.4 12.1,24.2 28.7,24.3 25.8,24.4 32.2,24.4 23.5,25.2 6.8,25.3 1.8,25.5 17.8,25.6 20.7,25.6 38.6,25.7 27.5,25.9 30.4,25.9 43.4,26.2 12.3,26.9 35.4,26.9 48.7,27.1 25.1,28.4 35.3,28.7 1.8,28.9 41.4,29 7.1,29.2 25.2,30 48.7,30.4 7.1,30.5 13.1,30.6 26.9,31.2 11.9,31.3 4.3,31.4 6.4,31.4 43.4,31.4 2.2,31.6 17.9,31.6 39.7,31.6 25.1,31.9 13.1,32 15.2,32.1 20.1,32.1 7.1,32.3
H: C2.1 CN1.3 CN2.3 P1.2 R3.1 U1.7 | length 41.9
  Top Layer w0.203: C2.1@35.2,10.2 C2.1
  Top Layer w0.381: U1.7 32.212,8.675 35.121,8.675 R3.1 ; C2.1@35.2,10.2 R3.1 ; CN2.3 48.5,24 48.5,21.005 P1.2 48.5,16.405 48.5,7 CN1.3 42.6,5.1 38.947,8.753 R3.1
L: C4.2 CN1.4 CN2.4 P1.1 R3.2 U1.6 | length 42.3
  Top Layer w0.203: R3.2@35.082,7.365 R3.2 ; C4.2@35.2,5.8 C4.2
  Top Layer w0.381: U1.6 R3.2@35.082,7.365 ; C4.2@35.2,5.8 R3.2 38.353,7.247 43,2.6 CN1.4@46.59,2.6
  Bottom Layer w0.381: CN1.4 48.5,4.5 48.5,12.595 P1.1 48.5,17.195 48.5,21.499 CN2.4
NetCN3_3: CN3.3 R9.2 | length 7.9
  Top Layer w0.203: R9.2 32.753,22.829 34.1,24.175 CN3.3
NetCN3_4: CN3.4 R8.2 | length 11.1
  Top Layer w0.203: R8.2 32.782,21.329 34.029,21.329 36.6,23.9 CN3.4
NetLED1_2: LED1.2 R5.2 | length 2.2
  Top Layer w0.203: R5.2 31.548,16.298 31.548,16.251 LED1.2
NetLED2_2: LED2.2 R6.2 | length 2.2
  Top Layer w0.203: R6.2 31.548,19.498 31.548,19.451 LED2.2
NetLED3_2: LED3.2 R4.2 | length 2.2
  Top Layer w0.203: R4.2 21.729,29.807 22.937,28.599 23.002,28.599 LED3.2
NRST: C10.1 R7.2 SW1.3 SW1.4 U3.7 | length 28.9
  Top Layer w0.203: SW1.3 17.8,3.85 ; v1(17.8,8.8) 17.8,3.85 ; v1(19.7,15.3) 20.65,16.25 U3.7 ; R7.2 C10.1 25.3,2.8 25.3,3.3 24.75,3.85 SW1.4 17.8,3.85
  Bottom Layer w0.203: v1(17.8,8.8) 17.8,13.4 v1(19.7,15.3)
OSC_IN: C11.2 U3.5 X1.2 | length 6.4
  Top Layer w0.203: U3.5 23.8,15.25 24.35,14.7 C11.2 26.194,14.7 26.396,14.498 26.752,14.498 X1.2@27.5,13.75
OSC_OUT: C14.2 U3.6 X1.1 | length 6.7
  Top Layer w0.203: U3.6 21.762,15.762 23.562,15.762 24.052,16.252 24.052,16.302 24.35,16.6 26.105,16.6 26.402,16.896 26.402,16.902 27.35,17.85 X1.1@27.5,17.85
PA0: LED1.1 U3.10 | length 15.1
  Top Layer w0.203: U3.10 21.763,17.763 22.774,17.763 23.4,18.389 23.4,19.6 23.92,20.12 29.242,20.12 29.881,19.482 29.881,18.7 30.3,18.281 30.3,15.9 LED1.1
PA1: LED2.1 U3.11 | length 12.6
  Top Layer w0.203: U3.11 21.763,18.263 22.629,18.263 22.9,18.534 22.9,19.8 23.7,20.6 29.5,20.6 30.35,19.75 30.35,19.051 LED2.1
SWCLK: R8.1 U3.37 | length 21
  Top Layer w0.203: U3.37 14.763,11.763 14.763,12.663 v1(15.8,13.7) ; v1(30,21.3) R8.1
  Bottom Layer w0.203: v1(15.8,13.7) 17.535,15.435 17.635,15.435 23.5,21.3 v1(30,21.3)
SWDIO: R9.1 U3.34 | length 21.5
  Top Layer w0.203: U3.34 14.317,14.25 15.367,15.3 v1(15.4,15.3) ; v1(30,22.8) R9.1
  Bottom Layer w0.203: v1(15.4,15.3) 22.9,22.8 v1(30,22.8)
pads on no net: CN1.1 CN2.1 U3.3 U3.4 U3.12 U3.13 U3.14 U3.15 U3.16 U3.17 U3.18 U3.19 U3.20 U3.21 U3.22 U3.25 U3.26 U3.27 U3.28 U3.29 U3.30 U3.31 U3.38 U3.39 U3.40 U3.41 U3.42 U3.43 USB1.3 USB1.4 USB1.9 USB1.10

## Polygon pours and split planes (outlines as drawn)
GND on Bottom Layer "GND_L02_P000" (solid, pour order 0): 0,0 0,33.5 50,33.5 50,0.1 0.1,0
GND on Top Layer "GND_L01_P001" (solid, remove dead copper, pour order 1): 0,0 0,33.5 50,33.5 50,0.1 0.1,0

## Keep-outs
Keep-Out Layer:
  the board outline again, w0.2

## Other copper
Top Layer:
  rectangle net GND: 7.6,19.675 8.781,20.226
  rectangle net GND: 7.8,13.275 9.2,13.828
  rectangle net 5V: 7.023,14.069 8.7,14.626
  rectangle net 3V3: 14.234,19.5 14.9,21
  rectangle net 5V: 7.4,18.875 9.929,19.426

## Silkscreen, mask and mechanical layers (free items; w line width, h text height)
Top Overlay:
  text "电源" at 21.254,31.168 h1.52
  text "GND" at 42.703,29.597 h1.02 r270
  text "CAN" at 40.877,27.746 h2.03 r270
  text "3V3" at 26.603,26.403 h1.02
  text "GND" at 29.903,26.403 h1.02
  text "DIO" at 33.203,26.403 h1.02
  text "CLK" at 36.403,26.403 h1.02
  text "H" at 42.703,25.597 h1.02 r270
  text "SWD" at 31.154,24.578 h2.03
  text "L" at 42.803,23.597 h1.02 r270
  text "CANable" at 14.754,23.082 h2.54
  text "H" at 40.903,18.997 h1.02 r270
  text "CAN" at 39.077,18.846 h2.03 r270
  text "TX" at 33.954,17.654 h1.52
  text "L" at 41.003,15.497 h1.02 r270
  text "RX" at 33.954,14.454 h1.52
  text "GND" at 42.603,9.097 h1.02 r270
  text "CAN" at 40.777,7.246 h2.03 r270
  text "H" at 42.603,5.097 h1.02 r270
  text "L" at 42.703,3.097 h1.02 r270
  text "BOOT" at 3.654,1.178 h2.03
  text "复位" at 14.756,1.129 h2.03